# Altium PCB NB2DSK01.PcbDoc (part 13 of 17)
Units mil, origin at the board's own origin, x right, y up, seen from the top; angles counter-clockwise.
Board outline 11815 x 6500.03 mil, 8 copper layers (Top Layer, MidLayer1, MidLayer2, GND, PWR, MidLayer3, MidLayer4, Bottom Layer), stack 74.62 mil thick; 798 components, 1002 nets, 3927 pads, 3182 vias.
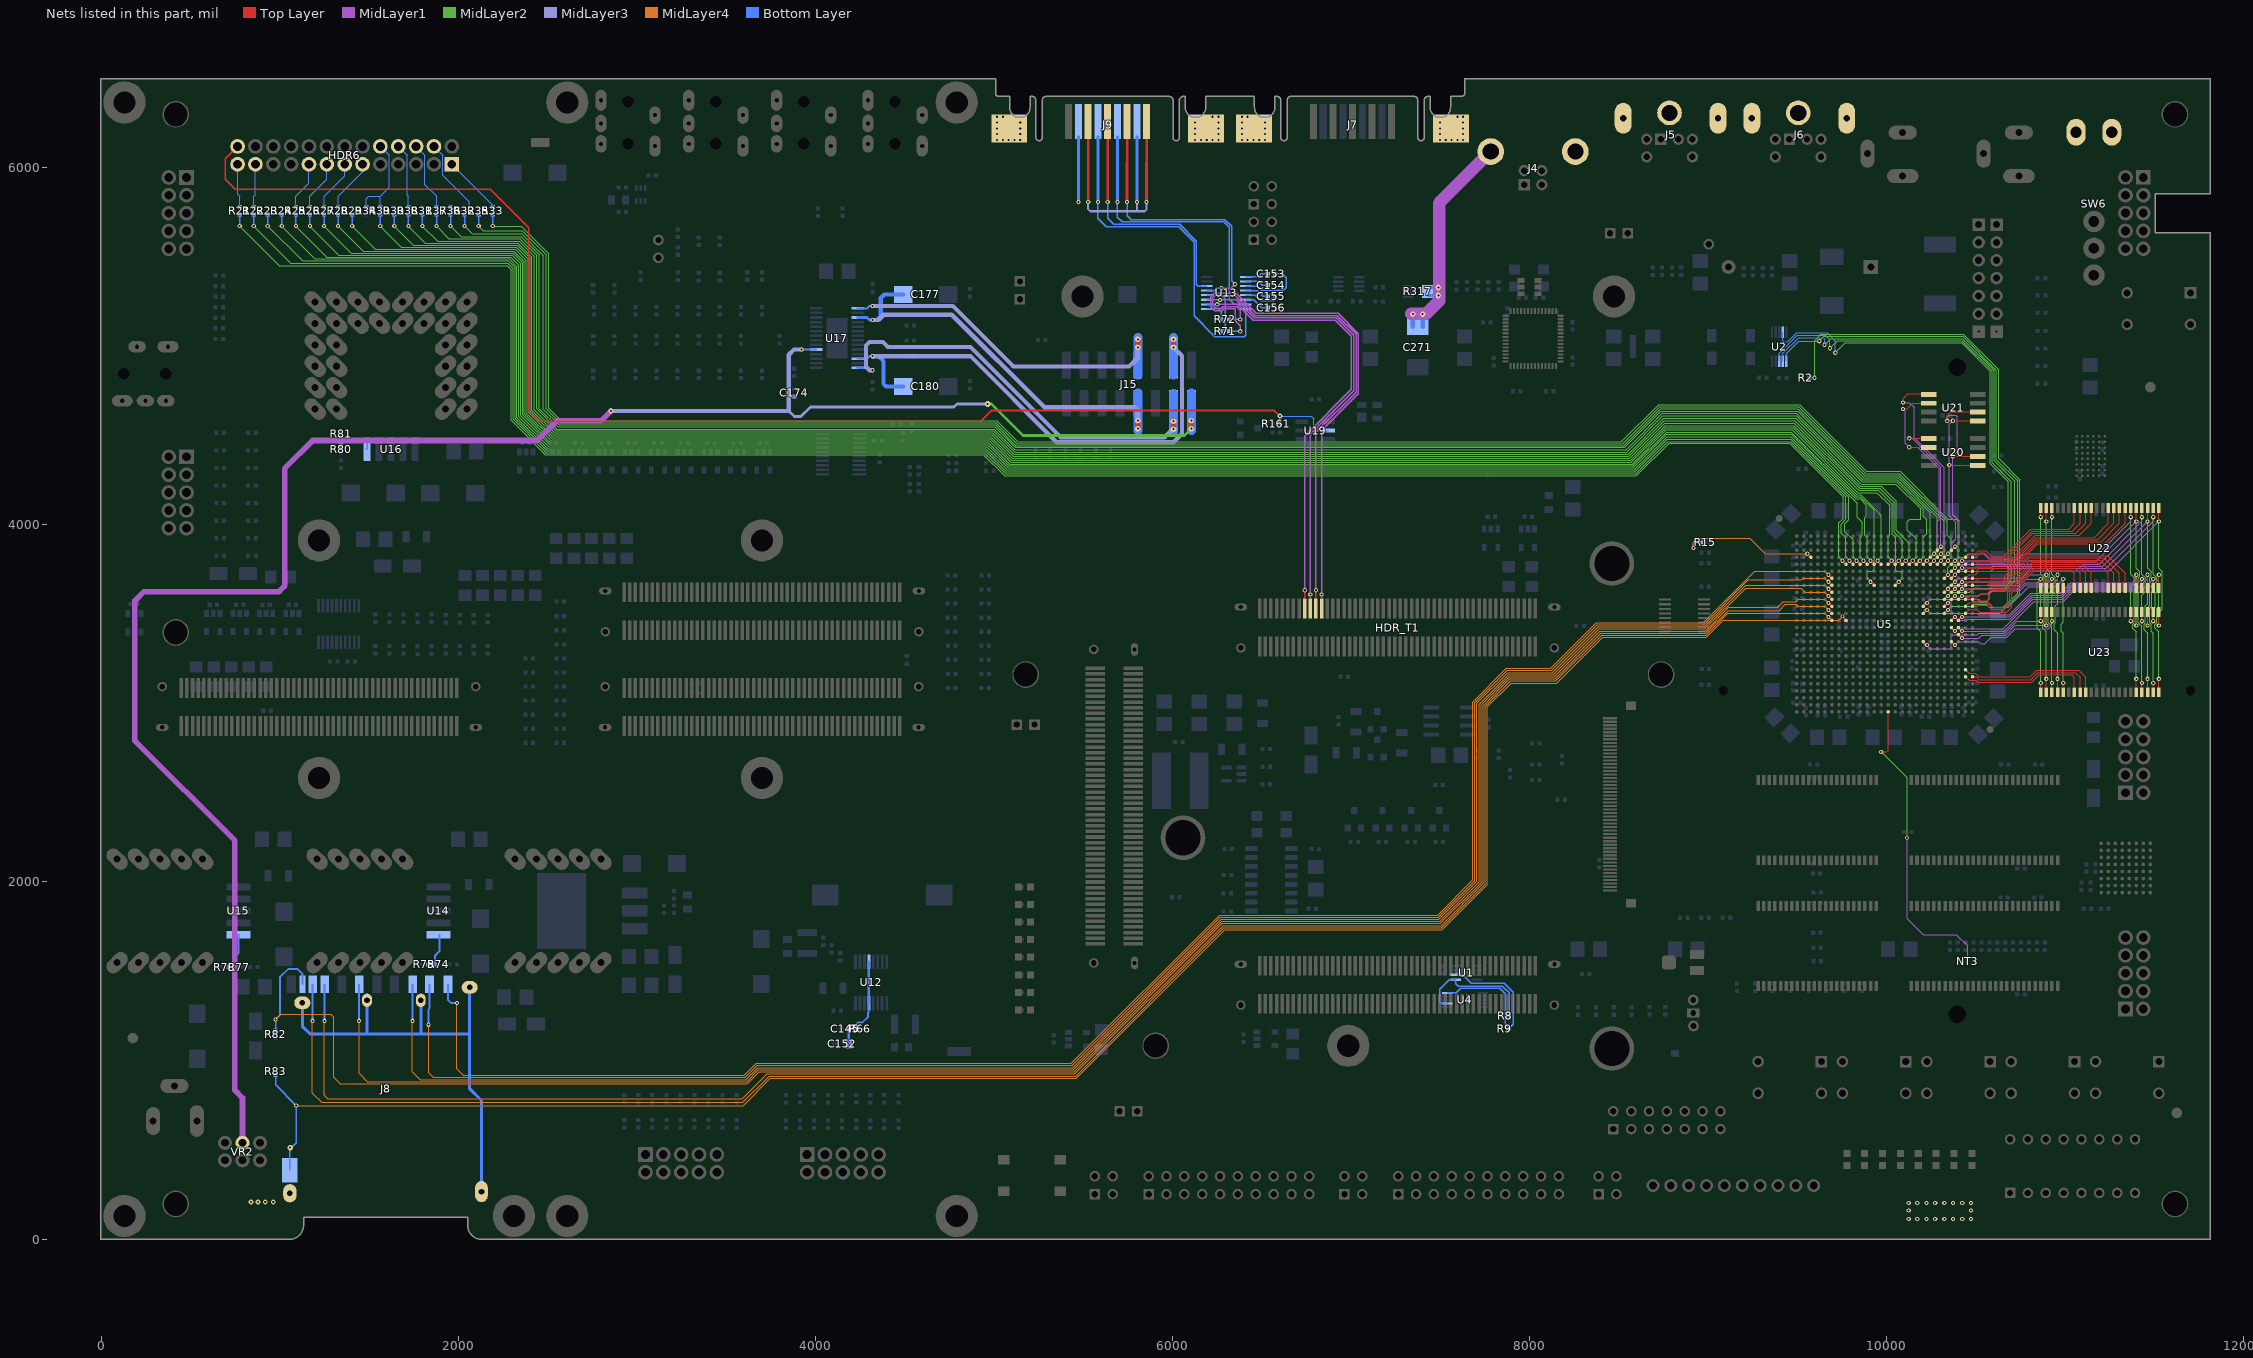
[diagram p19: the nets of this part, all layers, seen from the top]

## Via types
v1: diameter 23.62, hole 11.81, Top Layer to Bottom Layer, tented both sides, 1950 vias
v2: diameter 27.56, hole 11.81, Top Layer to Bottom Layer, tented both sides, 679 vias
v3: diameter 23.62, hole 11.81, Top Layer to Bottom Layer, 194 vias
v4: diameter 31.5, hole 11.81, Top Layer to Bottom Layer, tented both sides, 178 vias
v5: diameter 21.65, hole 11.81, Top Layer to Bottom Layer, tented both sides, 67 vias
v6: diameter 23.62, hole 11.81, Top Layer to Bottom Layer, tented bottom, 53 vias
v7: diameter 26, hole 11.81, Top Layer to Bottom Layer, tented both sides, 21 vias
v8: diameter 26, hole 11.81, Top Layer to Bottom Layer, 13 vias
v9: diameter 28, hole 11.81, Top Layer to Bottom Layer, 8 vias
v10: diameter 25.59, hole 11.81, Top Layer to Bottom Layer, tented both sides, 7 vias
v11: diameter 39.37, hole 11.81, Top Layer to Bottom Layer, tented both sides, 5 vias
v12: diameter 30, hole 11.81, Top Layer to Bottom Layer, 3 vias
v13: diameter 30, hole 11.81, Top Layer to Bottom Layer, tented both sides, 2 vias
v14: diameter 23, hole 11.81, Top Layer to Bottom Layer, tented both sides, 1 vias
v15: diameter 26.56, hole 11.81, Top Layer to Bottom Layer, tented both sides, 1 vias

## Nets (pads, with @x,y where several pads share a name; then routed paths per layer and width w, separated by ;. In a path a pad name is that pad's centre, name@x,y a point inside that pad or via, vN(x,y) a via of type N, cw(c..) or ccw(c..) an arc to the next point about the centre after c; other vN are vias at no path point) (continued)
PPRT#.D4: HDR6.6 R28.2 | length 295.4
  Bottom Layer w5: R28.2@1326.77,5781.02 1326.77,5840.55 1463.78,5977.56 HDR6.6@1463.78,6019.69
PPRT#.D5: HDR6.7 R27.2 | length 286.6
  Bottom Layer w5: R27.2@1248.03,5781.02 1248.03,5840.55 1363.78,5956.3 HDR6.7@1363.78,6019.69
PPRT#.D6: HDR6.8 R26.2 | length 277.8
  Bottom Layer w5: R26.2@1169.29,5781.02 1169.29,5840.55 1263.78,5935.04 HDR6.8@1263.78,6019.69
PPRT#.D7: HDR6.9 R25.2 | length 269
  Bottom Layer w5: R25.2@1090.55,5781.02 1090.55,5840.55 1163.78,5913.78 HDR6.9@1163.78,6019.69
PPRT#.DETECT: HDR6.18 R34.1 R39.2 | length 511.3
  Bottom Layer w5: R34.1@1484.25,5781.02 1484.25,5827.65 1497.15,5840.55 1562.99,5840.55 ; R39.2@1562.99,5781.02 1562.99,5840.55 ; HDR6.18@1563.78,6119.69 1613.94,6069.52 1613.94,5891.5 1562.99,5840.55
PPRT#.ERROR: HDR6.15 R36.1 | length 550.7
  Bottom Layer w5: HDR6.15@1863.78,6119.69 1913.9,6069.57 1913.9,5958.6 2062.1,5810.4 2062.1,5767.9 2054.9,5760.7 1977.02,5760.7 R36.1@1956.69,5781.02
PPRT#.INIT: HDR6.16 R37.2 | length 386
  Bottom Layer w5: HDR6.16@1763.78,6119.69 1812.9,6070.57 1812.9,5905.6 1877.95,5840.55 R37.2@1877.95,5781.02
PPRT#.ONE_WIRE_P: HDR6.26 R161.2 U19.2 | length 7699.6
  Top Layer w10: HDR6.26@763.78,6119.69 695,6050.91 695,5935 750,5880 2180,5880 2395,5665 2395,4635 2450,4580 4925.6,4580 4985.8,4640.2 6570.76,4640.2 v2(6601.98,4608.98)
  Bottom Layer w5: R161.2@6601.98,4567.47 v2(6601.98,4608.98) 6776.02,4608.98 6792,4593 6792,4542 6805.47,4528.53 U19.2@6874.27,4528.53
PPRT#.PE: HDR6.12 R22.1 | length 247.2
  Bottom Layer w5: R22.1@854.33,5781.02 854.33,5840.55 863.78,5850 HDR6.12@863.78,6019.69
  Bottom Layer w7.87: R22.1@854.33,5776.38 R22.1@854.33,5781.02
PPRT#.SELECT: HDR6.17 R38.2 | length 362.5
  Bottom Layer w5: HDR6.17@1663.78,6119.69 1713.94,6069.52 1713.94,5847.08 1720.47,5840.55 R38.2@1720.47,5781.02
  Bottom Layer w7.87: R38.2@1727.56,5780.71 R38.2@1727.56,5781.02
PPRT#.SELECTIN: HDR6.13 R21.1 | length 247.4
  Bottom Layer w5: HDR6.13@763.78,6019.69 763.78,5852.36 775.59,5840.55 R21.1@775.59,5781.02 R21.1@775.59,5777.17
PPRT#.STROBE: HDR6.1 R33.2 | length 333.6
  Bottom Layer w5: HDR6.1@1963.78,6019.69 2192.91,5790.55 R33.2@2192.91,5781.02
PPRT.ACK: R24.2 U5.E11 | length 10553.6
  Top Layer w7.87: v1(9870.08,3799.21) U5.E11@9889.76,3779.53
  MidLayer2 w5: v1(1011.81,5673.23) 1195.88,5489.16 2191.94,5489.16 2285.97,5489.16 2328.68,5446.45 2328.68,4600.46 2502.03,4427.11 4954.78,4427.11 5074.37,4307.52 8584.74,4307.52 8770.68,4493.45 9463.47,4493.45 9834.65,4122.28 9834.65,4043.31 9862.2,4015.75 9862.2,4000 9862.2,3940.95 9850.39,3929.13 9850.39,3818.9 v1(9870.08,3799.21)
  Bottom Layer w7.87: v1@1011.81,5677.17 R24.2@1011.81,5738.66 R24.2@1011.81,5740.55
PPRT.AUTOFD: R35.1 U5.E22 | length 9913.7
  Top Layer w7.87: U5.E22@10322.83,3779.53 v1(10342.52,3799.21)
  MidLayer2 w5: v1(2114.17,5673.23) 2139.95,5647.45 2357.68,5647.45 2492.68,5512.45 2492.68,4650.45 2570.68,4572.45 5010.22,4572.45 5128.51,4454.16 8521.39,4454.16 8728.68,4661.45 9507.49,4661.45 9881.54,4287.4 10070.87,4287.4 10338.58,4019.69 10338.58,3942.74 10362.2,3919.12 10362.2,3818.9 v1(10342.52,3799.21)
  Bottom Layer w7.87: v1@2114.17,5677.17 R35.1@2114.17,5738.66
PPRT.BUSY: R23.2 U5.E10 | length 10613.5
  Top Layer w7.87: v1(9830.71,3799.21) U5.E10@9850.39,3779.53
  MidLayer2 w5: v1(933.07,5673.23) 1128.3,5478 2279.13,5478 2317.68,5439.45 2317.68,4595.71 2497.41,4415.97 4950.17,4415.97 5069.76,4296.38 8588.61,4296.38 8771.68,4479.45 9463.33,4479.45 9787.4,4155.38 9787.4,4029.03 9764.68,4006.31 9764.68,3962.39 9811.02,3916.05 9811.02,3818.9 v1(9830.71,3799.21)
  Bottom Layer w7.87: v1@933.07,5677.17 R23.2@933.07,5738.66 R23.2@933.07,5740.95
PPRT.D0: R32.1 U5.E21 | length 9964.4
  Top Layer w7.87: U5.E21@10283.46,3779.53 v1(10303.15,3799.21)
  MidLayer2 w5: v1(2035.43,5673.23) 2079.21,5629.45 2354.68,5629.45 2476.68,5507.45 2476.68,4648.45 2564.68,4560.45 5006.48,4560.45 5122.77,4444.16 8527.39,4444.16 8733.68,4650.45 9501.78,4650.45 9876.65,4275.59 10066.93,4275.59 10322.83,4019.69 10322.83,4015.75 10322.83,4000 10322.83,3818.9 v1(10303.15,3799.21)
  Bottom Layer w7.87: v1@2035.43,5677.17 R32.1@2035.43,5738.66
PPRT.D1: R31.1 U5.E18 | length 10139.2
  Top Layer w7.87: U5.E18@10165.35,3779.53 v1(10185.04,3799.21)
  MidLayer2 w5: v1(1799.21,5673.23) 1884.11,5588.33 2341.8,5588.33 2426.68,5503.45 2426.68,4645.45 2545.31,4526.82 4996.08,4526.82 5115.67,4407.23 8543.46,4407.23 8746.68,4610.45 9491.68,4610.45 9861.97,4240.16 10055.12,4240.16 10204.72,4090.55 10204.72,4048.74 10223.68,4029.79 10223.68,3950.9 10204.72,3931.94 10204.72,3818.9 v1(10185.04,3799.21)
  Bottom Layer w7.87: v1@1799.21,5677.17 R31.1@1799.21,5738.66 R31.1@1799.21,5741.34
PPRT.D2: R30.1 U5.E16 | length 10176.1
  Top Layer w7.87: U5.E16@10086.61,3779.53 v1(10106.3,3799.21)
  MidLayer2 w5: v1(1641.73,5673.23) 1748.39,5566.57 2329.57,5566.57 2401.74,5494.39 2401.74,4637.63 2534.31,4505.06 4987.07,4505.06 5106.66,4385.47 8554.69,4385.47 8752.68,4583.45 9485.27,4583.45 9852.19,4216.54 9968.5,4216.54 10052.68,4132.36 10052.68,3969.18 10111.8,3910.06 10125.98,3895.87 10125.98,3818.9 v1(10106.3,3799.21)
  Bottom Layer w7.87: v1@1641.73,5677.17 R30.1@1641.73,5738.66
PPRT.D3: R29.1 U5.H15 | length 10497.1
  Top Layer w7.87: U5.H15@10047.24,3661.42 v1(10066.93,3681.1)
  MidLayer2 w5: v1(1405.51,5673.23) 1534.44,5544.3 2317.84,5544.3 2381.68,5480.45 2381.68,4626.19 2525.09,4482.79 4977.84,4482.79 5097.43,4363.19 8566.42,4363.19 8758.68,4555.45 9479.86,4555.45 9842.4,4192.91 9952.76,4192.91 10029.68,4115.99 10029.68,3946.91 10047.24,3929.35 10047.25,3748.68 10047.25,3747.64 10054.72,3740.16 10075.59,3740.16 10086.68,3729.07 10086.68,3700.85 v1(10066.93,3681.1)
  Bottom Layer w7.87: v1@1405.51,5677.17 R29.1@1405.51,5738.66
PPRT.D4: R28.1 U5.E14 | length 10409
  Top Layer w7.87: U5.E14@10007.87,3779.53 v1(10027.56,3799.21)
  MidLayer2 w5: v1(1326.77,5673.23) 1466.84,5533.16 2311.09,5533.16 2370.68,5473.57 2370.68,4621.44 2520.48,4471.65 4973.23,4471.65 5092.82,4352.06 8570.29,4352.06 8761.68,4543.45 9475.16,4543.45 9837.51,4181.1 9944.88,4181.1 10015.75,4110.24 10015.75,3945.9 10007.87,3938.03 10007.87,3818.9 v1(10027.56,3799.21)
  Bottom Layer w7.87: v1@1326.77,5677.17 R28.1@1326.77,5738.66 R28.1@1326.77,5741.73
PPRT.D5: R27.1 U5.E13 | length 10401
  Top Layer w7.87: v1(9948.82,3799.21) U5.E13@9968.5,3779.53
  MidLayer2 w5: v1(1248.03,5673.23) 1399.23,5522.03 2307.11,5522.03 2359.74,5469.39 2359.74,4616.64 2515.86,4460.51 4968.62,4460.51 5088.21,4340.92 8573.51,4340.92 8764.04,4531.45 9470.46,4531.45 9832.62,4169.29 9855.06,4169.29 9960.63,4063.72 9960.63,4058.85 9968.5,4050.98 9968.5,4015.75 9968.5,4000 9968.5,3818.9 v1(9948.82,3799.21)
  Bottom Layer w7.87: v1@1248.03,5677.17 R27.1@1248.03,5737.8
PPRT.D6: R26.1 U5.H12 | length 10629
  Top Layer w7.87: v1(9909.45,3681.1) U5.H12@9929.13,3661.42
  MidLayer2 w5: v1(1169.29,5673.23) 1331.63,5510.89 2301.24,5510.89 2349.74,5462.39 2349.74,4610.89 2511.25,4449.38 4964.01,4449.38 5083.6,4329.79 8577.02,4329.79 8766.68,4519.45 9465.75,4519.45 9827.73,4157.48 9852.72,4157.48 9929.13,4081.07 9929.13,3972.44 ; v1(9909.45,3681.1) 9889.76,3700.79 9889.76,3731.1 9898.82,3740.16 9920.08,3740.16 9929.13,3749.21 9929.13,3750.38 9929.13,4000
  Bottom Layer w7.87: v1@1169.29,5677.17 R26.1@1169.29,5738.66
PPRT.D7: R25.1 U5.E12 | length 10511.8
  Top Layer w7.87: v1(9909.45,3799.21) U5.E12@9929.13,3779.53
  MidLayer2 w5: v1(1090.55,5673.23) 1264.03,5499.75 2293.38,5499.75 2339.68,5453.45 2339.68,4605.2 2506.64,4438.24 4959.39,4438.24 5078.98,4318.65 8580.88,4318.65 8768.68,4506.45 9464.61,4506.45 9825.4,4145.67 9850.39,4145.67 9885.83,4110.24 9885.83,4047.24 9877.95,4039.37 9877.95,4015.75 9877.95,4000 9877.95,3940.95 9889.76,3929.13 9889.76,3818.9 v1(9909.45,3799.21)
  Bottom Layer w7.87: v1@1090.55,5677.17 R25.1@1090.55,5738.66
PPRT.ERROR: R36.2 U5.E20 | length 10019.2
  Top Layer w7.87: U5.E20@10244.09,3779.53 v1(10263.78,3799.21)
  MidLayer2 w5: v1(1956.69,5673.23) 2015.47,5614.45 2352.68,5614.45 2453.8,5513.33 2453.8,4651.33 2556.68,4548.45 5003.98,4548.45 5118.97,4433.45 8532.68,4433.45 8734.68,4635.45 9500.08,4635.45 9871.76,4263.78 10062.99,4263.78 10283.46,4043.31 10283.46,4015.75 10283.46,4000 10283.46,3818.9 v1(10263.78,3799.21)
  Bottom Layer w7.87: v1@1956.69,5677.17 R36.2@1956.69,5738.66 R36.2@1956.69,5742.13
PPRT.INIT: R37.1 U5.E19 | length 10071.4
  Top Layer w7.87: U5.E19@10204.72,3779.53 v1(10224.41,3799.21)
  MidLayer2 w5: v1(1877.95,5673.23) 1947.73,5603.45 2344.68,5603.45 2438.68,5509.45 2438.68,4649.45 2551.32,4536.82 5000.22,4536.82 5116.59,4420.45 8539.68,4420.45 8743.68,4624.45 9494.38,4624.45 9866.87,4251.97 10059.06,4251.97 10244.09,4066.93 10244.09,4015.75 10244.09,4000 10244.09,3818.9 v1(10224.41,3799.21)
  Bottom Layer w7.87: v1@1877.95,5677.17 R37.1@1877.95,5738.66 R37.1@1877.95,5740.55
PPRT.PE: R22.2 U5.E9 | length 10658.3
  Top Layer w7.87: v1(9791.34,3799.21) U5.E9@9811.02,3779.53
  MidLayer2 w5: v1(854.33,5673.23) 1062.11,5465.45 2276.68,5465.45 2306.68,5435.45 2306.68,4590.96 2492.8,4404.84 4945.56,4404.84 5065.15,4285.25 8593.47,4285.25 8774.68,4466.45 9462.19,4466.45 9771.65,4156.99 9771.65,4030.43 9745.68,4004.45 9745.68,3954.45 9771.65,3928.48 9771.65,3818.9 v1(9791.34,3799.21)
  Bottom Layer w7.87: v1@854.33,5677.17 R22.2@854.33,5730.04
PPRT.PLUG: R39.1 U5.E15 | length 10228.1
  Top Layer w7.87: U5.E15@10047.24,3779.53 v1(10066.93,3799.21)
  MidLayer2 w5: v1(1562.99,5673.23) 1680.79,5555.43 2323.7,5555.43 2391.74,5487.39 2391.74,4631.88 2529.7,4493.92 4982.46,4493.92 5102.05,4374.33 8560.56,4374.33 8755.68,4569.45 9482.56,4569.45 9847.3,4204.73 9960.63,4204.73 10041.68,4123.68 10041.68,3959.45 10086.61,3914.52 10086.61,3818.9 v1(10066.93,3799.21)
  Bottom Layer w7.87: v1@1562.99,5677.17 R39.1@1562.99,5738.66 1562.99,5741.73 R39.1@1563.78,5742.52
PPRT.SELECT: R38.1 U5.E17 | length 10273.3
  Top Layer w7.87: U5.E17@10125.98,3779.53 v1(10145.67,3799.21)
  MidLayer2 w5: v1(1720.47,5673.23) 1816,5577.7 2333.43,5577.7 2411.74,5499.39 2411.74,4643.37 2538.93,4516.19 4991.68,4516.19 5111.27,4396.6 8550.83,4396.6 8750.68,4596.45 9488.97,4596.45 9857.08,4228.35 10051.18,4228.35 10188.98,4090.55 10188.98,4030.62 10129.35,4030.62 10115.95,4017.22 10115.95,3970.67 10165.35,3921.26 10165.35,3818.9 v1(10145.67,3799.21)
  Bottom Layer w7.87: v1@1720.47,5677.17 R38.1@1720.47,5738.66 R38.1@1720.47,5746.46
PPRT.SELECTIN: R21.2 U5.E8 | length 10718.6
  Top Layer w7.87: v1(9751.97,3799.21) U5.E8@9771.65,3779.53
  MidLayer2 w5: v1(775.59,5673.23) 998.37,5450.45 2273.68,5450.45 2295.68,5428.45 2295.68,4586.21 2488.19,4393.7 4940.94,4393.7 5060.53,4274.11 8598.23,4274.11 8780.57,4456.45 9458.04,4456.45 9755.68,4158.82 9755.68,4035.45 9732.28,4012.06 9732.28,3818.9 v1(9751.97,3799.21)
  Bottom Layer w7.87: v1@775.59,5677.17 R21.2@775.59,5738.66
PPRT.STROBE: R33.1 U5.G22 | length 10007.3
  Top Layer w7.87: U5.G22@10322.83,3700.79 v1(10342.52,3720.47)
  MidLayer2 w5: v1(2192.91,5673.23) 2351.91,5673.23 2506.68,5518.45 2506.68,4654.45 2577.68,4583.45 5014.97,4583.45 5133.88,4464.54 8513.77,4464.54 8721.68,4672.45 9513.19,4672.45 9886.43,4299.21 10074.8,4299.21 10342.52,4031.5 10389.76,4031.5 10401.57,4019.69 10401.57,4003.94 10401.57,3787.4 10393.7,3779.53 10362.2,3779.53 10342.52,3759.84 v1(10342.52,3720.47)
  Bottom Layer w7.87: v1@2192.91,5677.17 R33.1@2192.91,5738.66 R33.1@2192.91,5742.52
PROG_B: R15.1 U5.D3 | length 815.2
  Top Layer w7.87: v1(9555.12,3838.58) U5.D3@9574.8,3818.9
  MidLayer4 w5: v1(8916.9,3870.9) 8916.9,3902.77 8939.32,3925.2 9232,3925.2 9318.61,3838.58 v1(9555.12,3838.58)
  Bottom Layer w5: v1(8916.9,3870.9) 8916.9,3894.7 8924.27,3902.07 R15.1@8962.1,3902.07
PWMVCCA: C145.1 C152.2 R66.1 U12.5 U12.12 | length 545.9
  Bottom Layer w10: R66.1@4229.5,1178.45 4229.5,1204.27 4238.68,1213.45 4263.68,1213.45 4293.68,1243.45 4293.68,1268.45 4299.18,1273.95 U12.5@4299.18,1321.45
  Bottom Layer w15: C152.2@4186.35,1094.18 C145.1@4186.35,1178.45 R66.1@4229.5,1178.45 ; U12.5@4299.18,1321.45 U12.12@4299.18,1553.45
REF_1V8: R74.2 R75.2 U14.5 | length 214.7
  Bottom Layer w8: R75.2@1829.86,1538.45 R74.2@1869.65,1538.45
  Bottom Layer w11.81: R74.2@1869.65,1538.45 1869.65,1587.71 1893.68,1611.75 U14.5@1893.68,1703.45
REF_2V5: R77.2 R78.1 U15.5 | length 220.5
  Bottom Layer w8: R78.1@719.86,1523.45 R77.2@752.5,1523.45
  Bottom Layer w11.81: R77.2@752.5,1523.45 752.5,1587.27 768.68,1603.45 U15.5@768.68,1704.6
REF_3V3: R80.1 R81.2 U16.5 | length 244.6
  Bottom Layer w10: R80.1@1343.68,4446.03 1343.68,4468.3 ; R80.1@1343.68,4451.03 R80.1@1344,4446.05 ; R81.2@1343.68,4488.67 1343.68,4468.3 ; R80.1@1344,4446.03 R80.1@1344.26,4441.85 ; U16.5@1483.64,4429.63 U16.5@1489.82,4423.45 1489.82,4456.38 1477.9,4468.3 1343.68,4468.3
RS232#.CTS: J9.8 U13.8 | length 1951.8
  Bottom Layer w7.87: v1(5582.15,5807.92) 5582.15,5716.95 5628.15,5670.95 6033.73,5670.95 6121.02,5583.67 6121.02,5171.18 6237.5,5054.7 6402.7,5054.7 6411.09,5063.09 U13.8@6411.09,5209.65
  Bottom Layer w15.75: v1(5582.15,5807.92) J9.8@5582.14,6173.81
RS232#.DCD: J9.1 J9.4 J9.6 | length 1735.7
  Top Layer w15.75: J9.4@5527.53,6258.86 v1(5527.62,5807.92) ; v1(5854.79,5807.92) J9.1@5855.29,6258.86
  MidLayer3 w11.81: v1(5527.62,5807.92) 5527.62,5768.38 5539.74,5756.26 5842.66,5756.26 5854.79,5768.38 v1(5854.79,5807.92) ; 5800.26,5756.26 v1(5800.26,5807.92)
  Bottom Layer w15.75: v1(5800.26,5807.92) J9.6@5800.25,6173.81
RS232#.RI: J9.9 | length 365.9
  Bottom Layer w15.75: v1(5473.09,5807.92) J9.9@5473.08,6173.81
RS232#.RTS: J9.7 U13.7 | length 1608.2
  Bottom Layer w7.87: v1(5691.2,5807.92) 5691.2,5722.9 5717.4,5696.7 6287.4,5696.7 6318.2,5665.9 6318.2,5264 6346.96,5235.24 U13.7@6411.09,5235.24
  Bottom Layer w15.75: v1(5691.2,5807.92) J9.7@5691.19,6173.81
RS232#.RXD: J9.2 U13.13 | length 1640.2
  Top Layer w15.75: v1(5745.73,5807.92) J9.2@5746.03,6258.87
  MidLayer1 w7.87: v1(6274.3,5325.1) 6327.29,5325.1 v1(6349.57,5347.38)
  Bottom Layer w7.87: v1(5745.73,5807.92) 5745.73,5732.57 5768.73,5709.57 6292.73,5709.57 6331.07,5671.23 6331.07,5365.88 v1(6349.57,5347.38) ; U13.13@6192.59,5312.01 6233.61,5312.01 6246.7,5325.1 v1(6274.3,5325.1)
RS232#.TXD: J9.3 U13.14 | length 1395.3
  Top Layer w15.75: v1(5636.68,5807.92) J9.3@5636.78,6258.87
  Bottom Layer w7.87: v1(5636.68,5807.92) 5636.68,5718.42 5671.27,5683.83 6039.07,5683.83 6133.89,5589 6133.89,5347.9 6144.19,5337.6 U13.14@6192.59,5337.6
RS232.CTS: HDR_T1.22 R72.1 | length 2852.1
  Top Layer w7.87: HDR_T1.22@6803.15,3531.5 v1(6803.15,3633.86)
  MidLayer1 w7.87: v1(6379,5150.61) 6379,5201.63 6358.26,5222.36 6280.36,5222.36 6272,5214 6241,5214 6226,5229 6226,5271 6238,5283 6352.25,5283 6463.5,5171.75 6922.37,5171.75 7027.75,5066.37 7027.75,4742.04 6803.15,4517.44 v1(6803.15,3633.86)
  Bottom Layer w7.87: R72.1@6315.54,5150.61 v1(6379,5150.61)
RS232.RTS: HDR_T1.18 U13.10 | length 2516.4
  Top Layer w7.87: HDR_T1.18@6740.16,3531.5 v1(6740.16,3633.86)
  MidLayer1 w7.87: v1(6250.66,5235.24) 6363.6,5235.24 6452.83,5146 6911.71,5146 7002,5055.71 7002,4758.96 6740.16,4497.11 v1(6740.16,3633.86)
  Bottom Layer w7.87: U13.10@6192.59,5235.24 v1(6250.66,5235.24)
RS232.RXD: HDR_T1.24 R71.1 | length 2959.3
  Top Layer w7.87: HDR_T1.24@6834.65,3531.5 v1(6834.64,3610.24)
  MidLayer1 w7.87: v1(6379,5084) 6379,5116 6351,5144 6351,5206.36 6347.87,5209.49 6285.7,5209.49 6275.21,5199 6237,5199 6213,5223 6213,5277 6232.49,5296.49 6356.96,5296.49 6468.83,5184.62 6927.7,5184.62 7040.62,5071.7 7040.62,4735.08 6834.64,4529.1 v1(6834.64,3610.24)
  Bottom Layer w7.87: R71.1@6315.54,5084 v1(6379,5084)
RS232.TXD: HDR_T1.20 U13.11 | length 2533.9
  Top Layer w7.87: HDR_T1.20@6771.65,3531.5 v1(6771.65,3610.24)
  MidLayer1 w7.87: v1(6266.22,5259.84) 6357.2,5259.84 6458.17,5158.87 6917.04,5158.87 7014.87,5061.04 7014.87,4751 6771.65,4507.78 v1(6771.65,3610.24)
  Bottom Layer w7.87: U13.11@6192.59,5260.83 v1@6265.24,5260.83
RS232_C1+: C153.1 U13.1 | length 129
  Bottom Layer w7.87: U13.1@6411.09,5388.78 6480.78,5388.78 6497.51,5405.51 C153.1@6533.14,5405.51
RS232_C1-: C153.2 U13.3 | length 364.8
  Bottom Layer w7.87: U13.3@6411.09,5337.6 6477.52,5337.6 6500.45,5314.67 6620.22,5314.67 6636.38,5330.82 6636.38,5382.83 6613.69,5405.51 C153.2@6574.48,5405.51
RS232_C2+: C155.1 U13.4 | length 135.5
  Bottom Layer w7.87: U13.4@6411.09,5312.01 6474.87,5312.01 6507.35,5279.53 C155.1@6533.14,5279.53
RS232_C2-: C155.2 U13.5 | length 203.6
  Bottom Layer w7.87: U13.5@6411.09,5286.42 6462.28,5286.42 6493.18,5255.51 6566.8,5255.51 6574.48,5263.19 C155.2@6574.48,5279.53 C155.2@6574.48,5287.4
RS232_CTS#: R72.2 U13.9 | length 139
  Bottom Layer w7.87: U13.9@6192.59,5209.65 6258.73,5209.65 6273.17,5195.2 R72.2@6273.17,5150.61 R72.2@6278.69,5145.09
RS232_RX#: R71.2 U13.12 | length 300.2
  Bottom Layer w7.87: U13.12@6192.59,5286.42 6273,5286.42 6294,5265.42 6294,5104.83 R71.2@6273.17,5084
RS232_V+: C154.2 U13.2 | length 130.6
  Bottom Layer w7.87: U13.2@6411.09,5363.19 6482.16,5363.19 6502.83,5342.52 C154.2@6533.14,5342.52
RS232_V-: C156.1 U13.6 | length 140.4
  Bottom Layer w7.87: U13.6@6411.09,5260.83 6455.39,5260.83 6499.68,5216.54 C156.1@6533.14,5216.54
RTC.CS_N: U2.4 U5.J22 | length 3003.6
  Top Layer w7.87: U5.J22@10322.83,3622.05 v1(10342.52,3641.73)
  MidLayer2 w5: v1(9712,4964) 9767.69,5019.69 10419,5019.69 10578.74,4859.95 10578.74,4342.63 10679.68,4241.69 10679.68,3687.56 10653.54,3661.42 10555.12,3661.42 10543.31,3661.42 10362.21,3661.42 v1(10342.52,3641.73)
  Bottom Layer w5: U2.4@9417.34,5078.18 9416.36,5077.19 9416.36,5030.93 9421.28,5026.01 9445.89,5026.01 9494.87,5075 9665.55,5075 9712,5028.55 v1(9712,4964)
RTC.DIN: U2.6 U5.M22 | length 3105.2
  Top Layer w7.87: U5.M22@10322.83,3503.94 v1(10342.52,3523.62)
  MidLayer2 w5: v1(9622,5029) 9648.12,5055.12 10425.99,5055.12 10614.17,4866.94 10614.17,4364.96 10732.28,4246.85 10732.28,3618.11 10653.54,3539.37 10574.8,3539.37 10559.06,3555.12 10543.31,3555.12 10484.25,3555.12 10472.44,3543.31 10362.21,3543.31 v1(10342.52,3523.62)
  Bottom Layer w5: U2.6@9437.03,4916.76 9437.03,4959.8 9506.23,5029 v1(9622,5029)
RTC.DOUT: U2.7 U5.L22 | length 3094.3
  Top Layer w7.87: U5.L22@10322.83,3543.31 v1(10342.52,3562.99)
  MidLayer2 w5: v1(9652,5009) 9686.31,5043.31 10423.66,5043.31 10602.36,4864.61 10602.36,4357.77 10715.68,4244.45 10715.68,3684.19 10661.42,3629.92 10586.61,3629.92 10574.8,3618.11 10574.8,3586.61 10559.06,3570.87 10543.31,3570.87 10484.25,3570.87 10472.44,3582.68 10362.21,3582.68 v1(10342.52,3562.99)
  Bottom Layer w5: U2.7@9417.34,4916.76 9417.34,4960.11 9505.78,5048.55 9643,5048.55 9652,5039.55 v1(9652,5009)
RTC.RST_N: R2.1 U5.M19 | length 3295.4
  Top Layer w7.87: U5.M19@10204.72,3503.94 v1(10224.41,3523.62)
  MidLayer2 w5: v1(9595.89,4823.89) 9595.89,5032 9630.82,5066.93 10428.32,5066.93 10625.98,4869.27 10625.98,4372.15 10744.09,4254.04 10744.09,3614.17 10633.86,3503.94 10562.99,3503.94 10543.31,3503.94 ; v1(10224.41,3523.62) 10244.09,3503.94 10543.31,3503.94 ; 10515.75,3503.94 10543.31,3503.94
  Bottom Layer w5: R2.1@9568,4823.89 v1(9595.89,4823.89)
RTC.SCLK: U2.8 U5.K22 | length 3063.3
  Top Layer w7.87: U5.K22@10322.83,3582.68 v1(10342.52,3602.36)
  MidLayer2 w5: v1(9682,4989) 9724.5,5031.5 10421.33,5031.5 10590.55,4862.28 10590.55,4348.58 10697.68,4241.45 10697.68,3685.87 10657.48,3645.67 10555.12,3645.67 10543.31,3645.67 10488.19,3645.67 10464.57,3622.05 10362.21,3622.05 v1(10342.52,3602.36)
  Bottom Layer w5: U2.8@9397.66,4916.76 9397.66,4962.04 9497.62,5062 9655.87,5062 9682,5035.87 v1(9682,4989)
SCL: R8.2 U1.5 U4.2 | length 702.3
  Bottom Layer w7.87: U4.2@7539.38,1319.69 7504,1319.69 7496,1327.69 7496,1399.68 7550,1453.68 U1.5@7586.54,1453.68 7586.54,1429.46 7599,1417 7847,1417 7884.97,1379.03 R8.2@7884.97,1251.8
SD.CLK: J8.5 U5.K6 | length 10521.2
  Top Layer w7.87: v1(9673.23,3602.36) U5.K6@9692.91,3582.68
  MidLayer4 w5: v1(1444.09,1222.44) 1444.09,927.79 1489.99,881.89 3614.17,881.89 3681.1,948.82 5444.88,948.82 6275.59,1779.53 7496.06,1779.53 7716.54,2000 7716.54,2996.06 7881.89,3161.42 8132.79,3161.42 8388.69,3417.32 8979.75,3417.32 9208.88,3646.45 9518.9,3646.45 9543.31,3622.05 9653.54,3622.05 v1(9673.23,3602.36)
  Bottom Layer w10: v1(1444.09,1222.44) J8.5@1444.1,1426.11
SD.CMD: J8.2 U5.J6 | length 10203.6
  Top Layer w7.87: v1(9673.23,3641.73) U5.J6@9692.91,3622.05
  MidLayer4 w5: v1(1743.11,1222.44) 1743.11,936.09 1785.5,893.7 3610.24,893.7 3677.17,960.63 5440.95,960.63 6271.65,1791.34 7492.13,1791.34 7704.72,2003.94 7704.72,3000 7877.95,3173.23 8127.89,3173.23 8383.8,3429.13 8977.42,3429.13 9209.7,3661.42 9413.39,3661.42 9433.07,3661.42 9653.54,3661.42 v1(9673.23,3641.73)
  Bottom Layer w10: v1(1743.11,1222.44) J8.2@1743.11,1426.11
SD.DAT0: J8.7 U5.M6 | length 10822.8
  Top Layer w7.87: v1(9673.23,3523.62) U5.M6@9692.91,3503.94
  MidLayer4 w5: v1(1250.2,1222.44) 1250.2,805.3 1269.05,786.45 3590.68,786.45 3729.43,925.2 5452.76,925.2 6283.46,1755.91 7503.94,1755.91 7740.16,1992.13 7740.16,2988.19 7889.76,3137.8 8142.57,3137.8 8398.48,3393.7 8984.41,3393.7 9111.16,3520.45 9397.75,3520.45 9432.42,3555.12 9492.13,3555.12 9503.94,3543.31 9653.54,3543.31 v1(9673.23,3523.62)
  Bottom Layer w10: v1(1250.2,1222.44) J8.7@1250.2,1426.11
SD.DAT1: J8.8 U5.N6 | length 10874.2
  Top Layer w7.87: v1(9673.23,3484.25) U5.N6@9692.91,3464.57
  MidLayer4 w5: v1(1183.27,1222.44) 1183.27,817.07 1234.89,765.45 3592.22,765.45 3740.16,913.39 5456.69,913.39 6287.4,1744.1 7507.87,1744.1 7751.97,1988.19 7751.97,2984.25 7893.7,3125.99 8147.46,3125.99 8403.37,3381.89 8986.74,3381.89 9108.79,3503.94 9413.39,3503.94 9433.07,3503.94 9653.54,3503.94 v1(9673.23,3484.25)
  Bottom Layer w10: v1(1183.27,1222.44) J8.8@1183.27,1426.11
SD.DAT2: J8.9 U5.G6 | length 10000.1
  Top Layer w7.87: v1(9673.23,3720.47) U5.G6@9692.91,3700.79
  MidLayer4 w5: v1(1992.27,1323.05) 1992.27,952.97 2027.92,917.32 3602.36,917.32 3669.29,984.25 5433.07,984.25 6263.78,1814.96 7484.25,1814.96 7681.1,2011.81 7681.1,3007.87 7870.08,3196.85 8118.11,3196.85 8374.02,3452.76 8972.76,3452.76 9260.16,3740.16 9413.39,3740.16 9433.07,3740.16 9653.54,3740.16 v1(9673.23,3720.47)
  Bottom Layer w10: J8.9@1941.52,1427.67 1941.52,1339.82 1958.28,1323.05 v1(1992.27,1323.05)
SD.DAT3: J8.1 U5.H6 | length 10126.4
  Top Layer w7.87: v1(9673.23,3681.1) U5.H6@9692.91,3661.42
  MidLayer4 w5: v1(1833.09,1200.91) 1833.09,932.49 1860.07,905.51 3606.3,905.51 3673.23,972.44 5437.01,972.44 6267.72,1803.15 7488.19,1803.15 7692.91,2007.87 7692.91,3003.94 7874.02,3185.04 8123,3185.04 8378.91,3440.95 8975.09,3440.95 9225.6,3691.45 9521,3691.45 9530.34,3700.79 9653.54,3700.79 v1(9673.23,3681.1)
  Bottom Layer w10: v1(1833.09,1200.91) 1833.1,1287.87 1839.35,1294.12 J8.1@1839.35,1427.67
SD.DETECT: J8.CD R82.2 U5.L6 | length 11332.2
  Top Layer w7.87: v1(9673.23,3562.99) U5.L6@9692.91,3543.31
  MidLayer4 w5: v1(976.38,1230.32) 1005.91,1259.84 1124.02,1259.84 ; 1125,1259.84 1285.43,1259.84 1303.15,1242.13 1303.15,905.22 1338.29,870.08 3618.11,870.08 3685.04,937.01 5448.82,937.01 6279.53,1767.72 7500,1767.72 7728.35,1996.06 7728.35,2992.13 7885.83,3149.61 8137.68,3149.61 8393.59,3405.51 8982.08,3405.51 9116.02,3539.45 9388.68,3539.45 9420.09,3570.87 9492.13,3570.87 9503.94,3582.68 9653.54,3582.68 v1(9673.23,3562.99)
  Bottom Layer w8: R82.2@976.38,1168.82 v1(976.38,1230.32)
  Bottom Layer w10: v1(976.38,1230.32) 1001,1254.94 1001,1465.45 1049,1513.45 1098.68,1513.45 1127.74,1484.4 J8.CD@1127.74,1427.67
SD.PROTECT: J8.WP R83.2 U5.N8 | length 11006.4
  Top Layer w7.87: v5@9751.97,3484.25 U5.N8@9771.65,3464.57
  MidLayer4 w5: v1(1092.52,748.03) 3594.49,748.03 3748.03,901.58 5460.63,901.58 6291.34,1732.28 7511.81,1732.28 7763.78,1984.25 7763.78,2980.32 7897.64,3114.17 8152.36,3114.17 8408.26,3370.08 8989.08,3370.08 9083.56,3464.57 9413.39,3464.57 9433.07,3464.57 9732.28,3464.57 v5@9751.97,3486.61
  Bottom Layer w7.87: R83.2@976.38,922.84 R83.2@976.38,919.76 976.38,864.17 v1(1092.52,748.03) 1092.52,539.52 1056.87,503.87 J8.WP@1056.87,385.15
  other v5: 9751.97,3488.19
  other v12: 1057.85,512.31
SDA: R9.2 U1.6 U4.5 | length 1126.5
  Bottom Layer w7.87: U4.5@7539.38,1378.75 7587.75,1378.75 7613.13,1404.13 7832.87,1404.13 7863,1374 7863,1197 R9.2@7883,1177 7909,1203 7909,1382 7858,1433 7673.16,1433 7629.84,1476.31 7626.89,1479.27 U1.6@7590.47,1479.27
SDRAM_FEEDBACK: NT3.1 U5.AF14 | length 1733.5
  Top Layer w5: v1(9968.5,2728.35) 10000,2728.35 10007.87,2736.22 U5.AF14@10007.87,2952.76
  MidLayer1 w5: v5(10114.17,2248.03) 10114.17,1795.28 10204.72,1704.73 10389.76,1704.73 10452.76,1641.73 NT3.1@10452.76,1562.99
  MidLayer2 w5: v1(9968.5,2728.35) 10114.17,2582.68 v5(10114.17,2248.03)
SFLASH.DIN: U5.D22 U20.5 U21.5 | length 1113.8
  Top Layer w5: v1(10350.39,4334.65) U20.5@10509.84,4334.65 ; v1(10370.08,4583.07) U21.5@10509.84,4583.07
  Top Layer w7.87: U5.D22@10322.83,3818.9 v1(10342.52,3838.58)
  MidLayer1 w5: v1(10342.52,3838.58) 10362.2,3858.27 10362.2,3893.7 10387.68,3919.17 10387.68,4013.9 10350.39,4051.18 v1(10350.39,4334.65) 10350.39,4563.39 v1(10370.08,4583.07)
SFLASH.DOUT: U5.D20 U20.2 U21.2 | length 1205.6
  Top Layer w5: v1(10090.55,4649.61) 10114.17,4649.61 10145.67,4681.1 U21.2@10234.25,4681.1 U21.2@10232.28,4683.07 ; v1(10125.98,4434.65) U20.2@10208.66,4434.65
  Top Layer w7.87: U5.D20@10244.09,3818.9 v1(10263.78,3838.58)
  MidLayer1 w5: v1(10090.55,4649.61) 10103.68,4636.48 10103.68,4456.95 v1(10125.98,4434.65) ; v1@10125.98,4433.07 v1(10125.98,4434.65) ; v1(10263.78,3838.58) 10283.46,3858.27 10283.46,4000 10283.46,4019.69 10292.73,4028.95 10292.73,4314.41 10172.49,4434.65 v1(10125.98,4434.65)
SFLASH.FLASH1_CS_N: U5.D21 U21.1 | length 1149
  Top Layer w5: v1(10090.55,4685.04) 10090.55,4704.73 10118.9,4733.07 U21.1@10208.66,4733.07
  Top Layer w7.87: U5.D21@10283.46,3818.9 v1(10303.15,3838.58)
  MidLayer1 w5: v1(10090.55,4685.04) 10125.98,4685.04 10153.54,4657.48 10153.54,4488.59 10322.83,4319.3 10322.83,4019.69 10322.83,4000 10322.83,3858.27 v1(10303.15,3838.58)
SFLASH.FLASH2_CS_N: U5.C21 U20.1 | length 799.8
  Top Layer w5: v1(10125.98,4484.65) U20.1@10208.66,4484.65
  Top Layer w7.87: U5.C21@10283.46,3858.27 v1(10303.15,3877.95)
  MidLayer1 w5: v1(10125.98,4484.65) 10141.74,4484.65 10303.15,4323.23 10303.15,4019.69 10303.15,4000 v1(10303.15,3877.95)
SFLASH.SCLK: U5.C23 U20.6 U21.6 | length 1220.5
  Top Layer w5: v1(10338.58,4582.68) 10338.58,4614.17 10357.48,4633.07 U21.6@10509.84,4633.07 ; v1(10370.08,4384.65) U20.6@10505,4384.65
  Top Layer w7.87: U5.C23@10362.2,3858.27 v1(10381.89,3877.95)
  MidLayer1 w5: v1(10338.58,4582.68) 10338.58,4606.3 10346.46,4614.17 10385.83,4614.17 10393.7,4606.3 10393.7,4408.27 v1(10370.08,4384.65) 10370.08,4056.6 10404.68,4022 10404.68,4010.98 10404.68,3992.96 10404.68,3900.75 v1(10381.89,3877.95)
SHIELD: C271.1 J4.5 J4.6 J5.MH1 J5.MH2 J5.MH3 J6.MH1 J6.MH2 J6.MH3 J7.10 J7.11 J8.S1 J8.S2 J8.S3 J8.S4 J8.S5 J8.S6 J9.10 J9.11 R317.1 SW6.S1 SW6.S2 | length 4027.9
  MidLayer1 w70: v4@7336.08,5182.23 7420.3,5182.23 7493.19,5255.12 7493.19,5801.86 J4.5@7781.89,6090.55
  Bottom Layer w17: J8.S6@1126.56,1323.34 1126.56,1192.34 1169.29,1149.61 2063.56,1149.61 ; 1488.76,1150.18 J8.S5@1488.76,1337.11 ; 1789.94,1151 J8.S4@1789.94,1337.11 ; J8.S3@2063.56,1409.95 2063.56,1149.61 ; J8.S1@2129.7,266.25 2129.7,775.81 2063.56,841.95 2063.56,1149.61 ; R317.1@7431.67,5284.64 v4(7488.65,5284.64) ; R317.1@7431.67,5329.55 v4(7488.65,5329.55)
  Bottom Layer w23.62: C271.1@7345.88,5109.24 v4(7345.88,5180.11) ; C271.1@7401,5109.24 v4(7401,5180.11)
  other v1: 10122.54,113 10171,113 10222.54,113 10271,113 10322.54,113 10371,113 10422.54,113 10471,113 10122.53,159.54 10471,159.54 10122.54,202 10171,202 10222.54,202 10271,202 10322.54,202 10371,202 10422.54,202 10471,202
  other v2: 838.68,208.45 878.68,208.45 918.68,208.45 963.68,208.45
  other v6: 5017,6156 5049.48,6156 5081.96,6156 5114.44,6156 5146.92,6156 6126.65,6156 6159.13,6156 6191.61,6156 6224.09,6156 6256.57,6156 6388.21,6156 6420.69,6156 6453.17,6156 6485.65,6156 6518.13,6156 7497.86,6156 7530.34,6156 7562.82,6156 7595.3,6156 7627.78,6156 5017,6188.48 5146.92,6188.48 6126.65,6188.48 6256.57,6188.48 6388.21,6188.48 6518.13,6188.48 7497.86,6188.48 7627.78,6188.48 5017,6220.96 5146.92,6220.96 6126.65,6220.96 6256.57,6220.96 6388.21,6220.96 6518.13,6220.96 7497.86,6220.96 7627.78,6220.96 5017,6253.44 5146.92,6253.44 6126.65,6253.44 6256.57,6253.44 6388.21,6253.44 6518.13,6253.44 7497.86,6253.44 7627.78,6253.44 5017,6285.92 5049.48,6285.92 6224.09,6285.92 6256.57,6285.92 6388.21,6285.92 6420.69,6285.92 7595.3,6285.92 7627.78,6285.92
SPK.SPK_L+: J15.8 U17.15 | length 2228.8
  Top Layer w30: v4(5805.51,4994.27) v4(5805.51,5039.19)
  MidLayer1 w30: v4(5805.51,4994.27) v4(5805.51,5039.19)
  MidLayer2 w30: v4(5805.51,4994.27) v4(5805.51,5039.19)
  MidLayer4 w30: v4(5805.51,4994.27) v4(5805.51,5039.19)
  MidLayer3 w23.62: v1(4318.9,5226.38) 4769.62,5226.38 5108.4,4887.6 5756.92,4887.6 5805.51,4936.19 v4(5805.51,4994.27)
  MidLayer3 w30: v4(5805.51,4994.27) v4(5805.51,5039.19)
  Bottom Layer w11.81: U17.15@4236.22,5212.6 4289.37,5212.6 4303.15,5226.38 v1(4318.9,5226.38)
  Bottom Layer w50: J15.8@5805.51,4838.98 v4@5805.51,5049.69
SPK.SPK_L-: C177.1 J15.7 U17.17 | length 2592.4
  Top Layer w30: v4(5805.51,4538.77) v4(5805.51,4583.68)
  MidLayer1 w30: v4(5805.51,4538.77) v4(5805.51,4583.68)
  MidLayer2 w30: v4(5805.51,4538.77) v4(5805.51,4583.68)
  MidLayer4 w30: v4(5805.51,4538.77) v4(5805.51,4583.68)
  MidLayer3 w23.62: v1(4318.9,5147.64) 4354.33,5147.64 4383.86,5177.17 4763.83,5177.17 5282.2,4658.8 5783.21,4658.8 5805.51,4636.5 v4(5805.51,4583.68)
  MidLayer3 w30: v4(5805.51,4538.77) v4(5805.51,4583.68)
  Bottom Layer w15.75: U17.17@4236.22,5161.42 4289.37,5161.42 4303.15,5147.64 v1(4318.9,5147.64)
  Bottom Layer w23.62: v1(4318.9,5147.64) 4346.46,5147.64 4366.14,5167.32 4366.14,5271.14 4385.38,5290.38 C177.1@4492.05,5290.38
  Bottom Layer w50: v4@5805.51,4528.27 J15.7@5805.51,4738.98
SPK.SPK_R+: J15.3 U17.28 | length 2655.7
  Top Layer w30: v4@6005.51,4538.77 v4@6005.51,4583.68
  MidLayer1 w30: v4@6005.51,4538.77 v4@6005.51,4583.68
  MidLayer2 w30: v4@6005.51,4538.77 v4@6005.51,4583.68
  MidLayer4 w30: v4@6005.51,4538.77 v4@6005.51,4583.68
  MidLayer3 w23.62: v1(4318.9,4866.14) 4303.15,4866.14 4283.46,4885.83 4283.46,5003.94 4303.15,5023.62 4377.95,5023.62 4405.51,4996.06 4868.31,4996.06 5373,4491.38 5956.61,4491.38 6004,4538.77 v4@6005.51,4538.77
  MidLayer3 w30: v4@6005.51,4538.77 v4@6005.51,4583.68
  Bottom Layer w11.81: U17.28@4236.22,4879.92 4289.37,4879.92 4303.15,4866.14 v1(4318.9,4866.14)
  Bottom Layer w50: v4@6005.48,4525.89 J15.3@6005.48,4736.6
  other v4: 6005.48,4536.39 6005.48,4581.3
SPK.SPK_R-: C180.1 J15.4 U17.26 | length 3297.7
  Top Layer w30: v4(6005.45,4994.27) v4(6005.45,5039.19)
  MidLayer1 w30: v4(6005.45,4994.27) v4(6005.45,5039.19)
  MidLayer2 w30: v4(6005.45,4994.27) v4(6005.45,5039.19)
  MidLayer4 w30: v4(6005.45,4994.27) v4(6005.45,5039.19)
  MidLayer3 w23.62: v1(4318.9,4944.88) 4868.12,4944.88 5350.24,4462.76 6004.69,4462.76 6052.47,4510.53 6052.47,4947.25 v4(6005.45,4994.27)
  MidLayer3 w30: v4(6005.45,4994.27) v4(6005.45,5039.19)
  Bottom Layer w11.81: U17.26@4236.22,4931.1 4289.37,4931.1 4303.15,4944.88 v1(4318.9,4944.88)
  Bottom Layer w23.62: v1(4318.9,4944.88) 4354.12,4944.88 4382,4917 4382,4790 4396.68,4775.32 C180.1@4492.05,4775.32
  Bottom Layer w50: J15.4@6005.51,4838.98 v4@6005.51,5049.69
SPK.VOL: C174.2 J15.1 U17.5 VR2.2 | length 11105.2
  Top Layer w30: v4(6105.51,4538.77) v4(6105.51,4583.68)
  MidLayer1 w30: v4(6105.51,4538.77) v4(6105.51,4583.68)
  MidLayer1 w31.5: VR2.2@791.34,539.37 791.34,790.8 748.68,833.45 748.68,2231.63 192.91,2787.4 189,2791.31 189,3574.83 240.67,3626.5 996.06,3626.5 1027.56,3657.99 1027.56,4314.96 1185.04,4472.44 2440.95,4472.44 2551.18,4582.68 2799.21,4582.68 v2(2854.33,4637.8)
  MidLayer2 w15.75: v4(4964.57,4677.17) 4986.83,4677.17 5163.1,4500.9 6067.65,4500.9 v4(6105.51,4538.77)
  MidLayer2 w30: v4(6105.51,4538.77) v4(6105.51,4583.68)
  MidLayer4 w30: v4(6105.51,4538.77) v4(6105.51,4583.68)
  MidLayer3 w15.75: 3850.39,4637.8 3881.89,4606.3 3918,4606.3 3971.7,4660 4775,4660 4792.17,4677.17 v4(4964.57,4677.17)
  MidLayer3 w23.62: v2(2854.33,4637.8) 3850.39,4637.8 3850.39,4952.76 3879.92,4982.28 v1(3921.26,4982.28)
  MidLayer3 w30: v4(6105.51,4538.77) v4(6105.51,4583.68)
  Bottom Layer w11.81: v1(3921.26,4982.28) U17.5@4003.94,4982.28
  Bottom Layer w15.75: v1(3850.39,4720.47) C174.2@3881.89,4720.47
  Bottom Layer w50: v4@6105.51,4528.27 J15.1@6105.51,4738.98
SRAM.A0: U5.J23 U22.1 U23.1 | length 1232.3
  Top Layer w5: U23.1@10862.2,3062.99 v1(10862.21,3114.17) ; U22.1@10862.2,3645.67 v1(10862.21,3696.85)
  Top Layer w7.87: U5.J23@10362.2,3622.05 v1(10381.89,3641.73)
  MidLayer1 w5: v1(10381.89,3641.73) 10401.58,3661.42 10543.31,3661.42 10562.99,3661.42 10744.09,3661.42 10779.53,3696.85 v1(10862.21,3696.85)
  MidLayer2 w5: v1(10862.21,3114.17) 10862.21,3401.58 10842.52,3421.26 10842.52,3677.17 v1(10862.21,3696.85)
SRAM.A1: U5.H24 U22.2 U23.2 | length 1265.2
  Top Layer w5: U23.2@10893.7,3062.99 v1(10893.7,3137.8) ; U22.2@10893.7,3645.67 v1(10893.7,3720.47)
  Top Layer w7.87: U5.H24@10401.58,3661.42 v1(10421.26,3681.1)
  MidLayer1 w5: v1(10421.26,3681.1) 10543.31,3681.1 10562.99,3681.1 10748.03,3681.1 10787.4,3720.47 v1(10893.7,3720.47)
  MidLayer2 w5: v1(10893.7,3137.8) 10893.7,3401.58 10874.02,3421.26 10874.02,3444.88 10881.89,3452.76 10881.89,3641.73 10893.7,3653.54 v1(10893.7,3720.47)
SRAM.A2: U5.J24 U22.3 U23.3 | length 1256
  Top Layer w5: U23.3@10925.2,3062.99 v1(10925.2,3114.17) ; U22.3@10925.2,3645.67 v1(10925.2,3696.85)
  Top Layer w7.87: U5.J24@10401.58,3622.05 v1(10421.26,3641.73)
  MidLayer1 w5: v1(10421.26,3641.73) 10543.31,3641.73 10562.99,3641.73 10740.16,3641.73 10775.59,3677.17 10905.51,3677.17 v1(10925.2,3696.85)
  MidLayer2 w5: v1(10925.2,3114.17) 10925.2,3433.07 10905.51,3452.76 10905.51,3618.11 10925.2,3637.8 v1(10925.2,3696.85)
SRAM.A3: U5.K24 U22.4 U23.4 | length 1374.6
  Top Layer w5: U23.4@10956.69,3062.99 v1(10956.7,3137.8) ; U22.4@10956.69,3645.67 v1(10956.69,3720.47)
  Top Layer w7.87: U5.K24@10401.58,3582.68 v1(10421.26,3602.36)
  MidLayer1 w5: v1(10421.26,3602.36) 10515.75,3602.36 10527.56,3614.17 10543.31,3614.17 10562.99,3614.17 10570.87,3614.17 10586.61,3629.92 10744.09,3629.92 10779.53,3665.36 10925.2,3665.36 10956.69,3696.85 v1(10956.69,3720.47)
  MidLayer2 w5: v1(10956.7,3137.8) 10956.7,3393.7 10937.01,3413.39 10937.01,3444.88 10944.88,3452.76 10944.88,3547.24 10956.69,3559.06 v1(10956.69,3720.47)
SRAM.A4: U5.K23 U22.5 U23.5 | length 1420.3
  Top Layer w5: U23.5@10988.19,3062.99 v1(10988.19,3114.17) ; U22.5@10988.19,3645.67 v1(10988.19,3696.85)
  Top Layer w7.87: U5.K23@10362.2,3582.68 v1(10381.89,3602.36)
  MidLayer1 w5: v1(10381.89,3602.36) 10401.58,3582.68 10515.75,3582.68 10527.56,3570.87 10543.31,3570.87 10562.99,3570.87 10594.49,3539.37 10681.1,3539.37 10795.28,3653.54 10944.88,3653.54 v1(10988.19,3696.85)
  MidLayer2 w5: v1(10988.19,3114.17) 10988.19,3393.7 10976.38,3405.51 10976.38,3444.88 10988.19,3456.69 v1(10988.19,3696.85)
SRAM.A5: U5.L19 U22.18 U23.18 | length 2135.1
  Top Layer w5: U23.18@11397.64,3062.99 v1(11397.64,3137.8) ; U22.18@11397.64,3645.67 v1(11397.64,3720.47)
  Top Layer w7.87: U5.L19@10204.72,3543.31 v1(10224.41,3562.99)
  MidLayer1 w5: v1(10224.41,3562.99) 10244.1,3582.68 10354.33,3582.68 10362.2,3574.8 10362.2,3515.75 10374.02,3503.94 10507.87,3503.94 10515.75,3496.06 10543.31,3496.06 10562.99,3496.06 10685.04,3496.06 10807.09,3618.11 10972.44,3618.11 11031.5,3677.17 11377.95,3677.17 11397.64,3696.85 v1(11397.64,3720.47)
  MidLayer2 w5: v1(11397.64,3137.8) 11397.64,3401.58 11377.95,3421.26 11377.95,3444.88 11385.83,3452.76 11385.83,3641.73 11397.64,3653.54 v1(11397.64,3720.47)
SRAM.A6: U5.N24 U22.19 U23.19 | length 1825.1
  Top Layer w5: U23.19@11429.13,3062.99 v1(11429.13,3114.17) ; U22.19@11429.13,3645.67 v1(11429.13,3696.85)
  Top Layer w7.87: U5.N24@10401.58,3464.57 v1(10421.26,3484.25)
  MidLayer1 w5: v1(10421.26,3484.25) 10543.31,3484.25 10562.99,3484.25 10688.98,3484.25 10811.02,3606.3 10976.38,3606.3 11035.43,3665.36 11397.64,3665.36 v1(11429.13,3696.85)
  MidLayer2 w5: v1(11429.13,3114.17) 11429.13,3433.07 11409.45,3452.76 11409.45,3618.11 11429.13,3637.8 v1(11429.13,3696.85)
SRAM.A7: U5.N23 U22.20 U23.20 | length 1980.9
  Top Layer w5: U23.20@11460.63,3062.99 v1(11460.63,3137.8) ; U22.20@11460.63,3645.67 v1(11460.63,3720.47)
  Top Layer w7.87: U5.N23@10362.2,3464.57 v1(10381.89,3484.25)
  MidLayer1 w5: v1(10381.89,3484.25) 10401.58,3464.57 10433.07,3464.57 10440.95,3472.44 10543.31,3472.44 10562.99,3472.44 10692.91,3472.44 10814.96,3594.49 10980.32,3594.49 11039.37,3653.54 11413.39,3653.54 11460.63,3700.79 v1(11460.63,3720.47)
  MidLayer2 w5: v1(11460.63,3137.8) 11460.63,3393.7 11440.95,3413.39 11440.95,3444.88 11448.82,3452.76 11448.82,3547.24 11460.63,3559.06 v1(11460.63,3720.47)
SRAM.A8: U5.P23 U22.21 U23.21 | length 1966.6
  Top Layer w5: U23.21@11492.13,3062.99 v1(11492.13,3114.17) ; U22.21@11492.13,3645.67 v1(11492.13,3696.85)
  Top Layer w7.87: U5.P23@10362.2,3425.2 v1(10381.89,3405.51)
  MidLayer1 w5: v1(10381.89,3405.51) 10401.58,3425.2 10433.07,3425.2 10440.95,3417.32 10543.31,3417.32 10562.99,3417.32 10653.54,3417.32 10818.9,3582.68 10984.25,3582.68 11043.31,3641.73 11437.01,3641.73 v1(11492.13,3696.85)
  MidLayer2 w5: v1(11492.13,3114.17) 11492.13,3393.7 11480.32,3405.51 11480.32,3444.88 11472.44,3452.76 11472.44,3531.5 11484.25,3543.31 11484.25,3622.05 11492.13,3629.92 v1(11492.13,3696.85)
SRAM.A9: U5.P24 U22.22 U23.22 | length 2026.4
  Top Layer w5: U23.22@11523.62,3062.99 v1(11523.62,3137.8) ; U22.22@11523.62,3645.67 v1(11523.62,3720.47)
  Top Layer w7.87: U5.P24@10401.58,3425.2 v1(10421.26,3405.51)
  MidLayer1 w5: v1(10421.26,3405.51) 10543.31,3405.51 10562.99,3405.51 10657.48,3405.51 10822.83,3570.87 10988.19,3570.87 11047.24,3629.92 11456.69,3629.92 11523.62,3696.85 v1(11523.62,3720.47)
  MidLayer2 w5: v1(11523.62,3137.8) 11523.62,3401.58 11500,3425.2 11500,3440.95 11511.81,3452.76 11511.81,3531.5 11523.62,3543.31 v1(11523.62,3720.47)
SRAM.A10: U5.H23 U22.23 U23.23 | length 2058.4
  Top Layer w5: v1(11523.62,3437.01) U23.23@11523.62,3511.81 ; v1(11523.62,4019.69) U22.23@11523.62,4094.49
  Top Layer w7.87: U5.H23@10362.2,3661.42 v1(10381.89,3681.1)
  MidLayer1 w5: v1(10381.89,3681.1) 10401.58,3700.79 10543.31,3700.79 10562.99,3700.79 10751.97,3700.79 10795.28,3744.1 11248.03,3744.1 v1(11523.62,4019.69)
  MidLayer2 w5: v1(11523.62,3437.01) 11523.62,3507.87 11543.31,3527.56 11543.31,3736.22 11523.62,3755.91 v1(11523.62,4019.69)
SRAM.A11: U5.G23 U22.24 U23.24 | length 1987
  Top Layer w5: v1(11492.13,3460.63) U23.24@11492.13,3511.81 ; v1(11492.13,4043.31) U22.24@11492.13,4094.49
  Top Layer w7.87: U5.G23@10362.2,3700.79 v1(10381.89,3720.47)
  MidLayer1 w5: v1(10381.89,3720.47) 10401.58,3740.16 10543.31,3740.16 10562.99,3740.16 10582.68,3740.16 10598.43,3755.91 11228.35,3755.91 11492.13,4019.69 v1(11492.13,4043.31)
  MidLayer2 w5: v1(11492.13,3460.63) 11492.13,3527.56 11503.94,3539.37 11503.94,3618.11 11511.81,3625.99 11511.81,3704.73 11492.13,3724.41 v1(11492.13,4043.31)
SRAM.A12: U5.F24 U22.25 U23.25 | length 1923.4
  Top Layer w5: v1(11460.63,3437.01) U23.25@11460.63,3511.81 ; v1(11460.63,4019.69) U22.25@11460.63,4094.49
  Top Layer w7.87: U5.F24@10401.58,3740.16 v1(10421.26,3759.84)
  MidLayer1 w5: v1(10421.26,3759.84) 10543.31,3759.84 10562.99,3759.84 10586.61,3759.84 10594.49,3767.72 11208.66,3767.72 11320.43,3879.49 v1(11460.63,4019.69)
  MidLayer2 w5: v1(11460.63,3437.01) 11460.63,3539.37 11472.44,3551.18 11472.44,3704.73 11480.32,3712.6 11480.32,3736.22 11460.63,3755.91 v1(11460.63,4019.69)
SRAM.A13: U5.F23 U22.26 U23.26 | length 1907.7
  Top Layer w5: v1(11429.13,3460.63) U23.26@11429.13,3511.81 ; v1(11429.13,4043.31) U22.26@11429.13,4094.49
  Top Layer w7.87: U5.F23@10362.2,3740.16 v1(10381.89,3759.84)
  MidLayer1 w5: v1(10381.89,3759.84) 10401.58,3779.53 10543.31,3779.53 10562.99,3779.53 11188.98,3779.53 11429.13,4019.69 v1(11429.13,4043.31)
  MidLayer2 w5: v1(11429.13,3460.63) 11429.13,3606.3 11448.82,3625.99 11448.82,3704.73 11429.13,3724.41 v1(11429.13,4043.31)
SRAM.A14: U5.E24 U22.27 U23.27 | length 1844.1
  Top Layer w5: v1(11397.64,3437.01) U23.27@11397.64,3511.81 ; v1(11397.64,4019.69) U22.27@11397.64,4094.49
  Top Layer w7.87: U5.E24@10401.58,3779.53 v1(10421.26,3799.21)
  MidLayer1 w5: v1(10421.26,3799.21) 10543.31,3799.21 10562.99,3799.21 11177.17,3799.21 v1(11397.64,4019.69)
  MidLayer2 w5: v1(11397.64,3437.01) 11397.64,3629.92 11409.45,3641.73 11409.45,3704.73 11417.32,3712.6 11417.32,3736.22 11397.64,3755.91 v1(11397.64,4019.69)
SRAM.A15: U5.T23 U22.42 U23.42 | length 1351.6
  Top Layer w5: v1(10925.2,3460.63) U23.42@10925.2,3511.81 ; v1(10925.2,4043.31) U22.42@10925.2,4094.49
  Top Layer w7.87: U5.T23@10362.2,3346.46 v1(10381.89,3326.77)
  MidLayer1 w5: v1(10381.89,3326.77) 10401.58,3346.46 10515.75,3346.46 10527.56,3334.65 10549.97,3334.65 10584.78,3369.45 10672.6,3369.45 10720.47,3417.32 10905.51,3417.32 10925.2,3437.01 v1(10925.2,3460.63)
  MidLayer2 w5: v1(10925.2,3460.63) 10925.2,3606.3 10944.88,3625.99 10944.88,3704.73 10925.2,3724.41 v1(10925.2,4043.31)
SRAM.A16: U5.R24 U22.43 U23.43 | length 1278.2
  Top Layer w5: v1(10893.7,3437.01) U23.43@10893.7,3511.81 ; v1(10893.7,4019.69) U22.43@10893.7,4094.49
  Top Layer w7.87: U5.R24@10401.58,3385.83 v1(10421.26,3366.14)
  MidLayer1 w5: v1(10421.26,3366.14) 10515.75,3366.14 10531.5,3381.89 10543.31,3381.89 10562.99,3381.89 10665.35,3381.89 10720.47,3437.01 v1(10893.7,3437.01)
  MidLayer2 w5: v1(10893.7,3437.01) 10893.7,3629.92 10905.51,3641.73 10905.51,3704.73 10913.39,3712.6 10913.39,3736.22 10893.7,3755.91 v1(10893.7,4019.69)
SRAM.A17: U5.T19 U22.44 U23.44 | length 1473.3
  Top Layer w5: v1(10862.21,3460.63) U23.44@10862.21,3511.81 ; v1(10862.21,4043.31) U22.44@10862.21,4094.49
  Top Layer w7.87: U5.T19@10204.72,3346.46 v1(10224.41,3326.77)
  MidLayer1 w5: v1(10224.41,3326.77) 10244.1,3307.09 10354.33,3307.09 10362.2,3314.96 10362.2,3374.02 10374.02,3385.83 10507.87,3385.83 10515.75,3393.7 10543.31,3393.7 10562.99,3393.7 10661.42,3393.7 10728.35,3460.63 v1(10862.21,3460.63)
  MidLayer2 w5: v1(10862.21,3460.63) 10862.21,3649.61 10881.89,3669.29 10881.89,3704.73 10862.21,3724.41 v1(10862.21,4043.31)
SRAM.A18: U5.E23 U22.28 U23.28 | length 1850.9
  Top Layer w5: v1(11366.14,3460.63) U23.28@11366.14,3511.81 ; v1(11366.14,4043.31) U22.28@11366.14,4094.49
  Top Layer w7.87: U5.E23@10362.2,3779.53 v1(10381.89,3799.21)
  MidLayer1 w5: v1(10381.89,3799.21) 10401.58,3818.9 10437.01,3818.9 10456.69,3838.58 10543.47,3838.58 10570.6,3811.45 10738.53,3811.45 10765.66,3838.58 11185.04,3838.58 11366.14,4019.69 v1(11366.14,4043.31)
  MidLayer2 w5: v1(11366.14,3460.63) 11366.14,3649.61 11385.83,3669.29 11385.83,3704.73 11366.14,3724.41 v1(11366.14,4043.31)
SRAM.D0: U5.M25 U22.7 | length 854.8
  Top Layer w5: U5.M25@10440.95,3503.94 10460.63,3523.62 10507.87,3523.62 10519.69,3511.81 10543.31,3511.81 10562.99,3511.81 10673.23,3511.81 10700.79,3539.37 10700.79,3618.11 10826.77,3744.1 11035.43,3744.1 11051.18,3728.35 U22.7@11051.18,3645.67
SRAM.D1: U5.L26 U22.8 | length 841
  Top Layer w5: U5.L26@10480.32,3543.31 10507.87,3543.31 10515.75,3551.18 10543.31,3551.18 10562.99,3551.18 10586.61,3527.56 10657.48,3527.56 10688.98,3559.06 10688.98,3622.05 10822.83,3755.91 11055.12,3755.91 11082.68,3728.35 U22.8@11082.68,3645.67
SRAM.D2: U5.L25 U22.9 | length 921.6
  Top Layer w5: U5.L25@10440.95,3543.31 10460.63,3562.99 10543.31,3562.99 10562.99,3562.99 10570.87,3562.99 10594.49,3539.37 10653.54,3539.37 10677.17,3562.99 10677.17,3625.98 10818.9,3767.72 11074.8,3767.72 11114.17,3728.35 U22.9@11114.17,3645.67
SRAM.D3: U5.K26 U22.10 | length 871.1
  Top Layer w5: U5.K26@10480.32,3582.68 10507.87,3582.68 10515.75,3574.8 10543.31,3574.8 10562.99,3574.8 10574.8,3586.61 10574.8,3610.24 10598.43,3633.86 10669.29,3633.86 10814.96,3779.53 11094.49,3779.53 11145.67,3728.35 U22.10@11145.67,3645.67
SRAM.D4: U5.K25 U22.13 | length 994.4
  Top Layer w5: U5.K25@10440.95,3582.68 10460.63,3602.36 10515.75,3602.36 10527.56,3614.17 10543.31,3614.17 10562.99,3614.17 10598.11,3649.29 10668.98,3649.29 10811.02,3791.34 11177.17,3791.34 11240.16,3728.35 U22.13@11240.16,3645.67
SRAM.D5: U5.J25 U22.14 | length 1019.4
  Top Layer w5: U5.J25@10440.95,3622.05 10460.63,3641.73 10543.31,3641.73 10562.99,3641.73 10570.87,3641.73 10588.43,3659.29 10659.29,3659.29 10803.15,3803.15 11196.85,3803.15 11271.65,3728.35 U22.14@11271.65,3645.67
SRAM.D6: U5.H26 U22.15 | length 1005
  Top Layer w5: U5.H26@10480.32,3661.42 10543.31,3661.42 10562.99,3661.42 10570.87,3669.29 10653.54,3669.29 10669.29,3685.04 10799.21,3814.96 11216.54,3814.96 11303.15,3728.35 U22.15@11303.15,3645.67
SRAM.D7: U5.H25 U22.16 | length 1085.6
  Top Layer w5: U5.H25@10440.95,3661.42 10460.63,3681.1 10543.31,3681.1 10562.99,3681.1 10649.61,3681.1 10795.28,3826.77 11236.22,3826.77 11334.65,3728.35 U22.16@11334.65,3645.67
SRAM.D8: U5.G26 U22.29 | length 1068.1
  Top Layer w5: U5.G26@10480.32,3700.79 10543.31,3700.79 10562.99,3700.79 10653.54,3700.79 10846.46,3893.7 11220.47,3893.7 11334.65,4007.87 U22.29@11334.65,4094.49
SRAM.D9: U5.G25 U22.30 | length 1076
  Top Layer w5: U5.G25@10440.95,3700.79 10460.63,3720.47 10496.06,3720.47 10515.75,3740.16 10543.31,3740.16 10562.99,3740.16 10676.39,3740.16 10841.74,3905.51 11200.79,3905.51 11303.15,4007.87 U22.30@11303.15,4094.49
SRAM.D10: U5.F26 U22.31 | length 988.8
  Top Layer w5: U5.F26@10480.32,3740.16 10500,3740.16 10515.75,3755.91 10543.31,3755.91 10562.99,3755.91 10676.13,3755.91 10837.55,3917.32 11181.1,3917.32 11271.65,4007.87 U22.31@11271.65,4094.49
SRAM.D11: U5.F25 U22.32 | length 996.7
  Top Layer w5: U5.F25@10440.95,3740.16 10460.63,3759.84 10500,3759.84 10511.81,3771.65 10543.31,3771.65 10562.99,3771.65 10675.95,3771.65 10833.43,3929.13 11161.42,3929.13 11240.16,4007.87 U22.32@11240.16,4094.49
SRAM.D12: U5.E26 U22.35 | length 846.6
  Top Layer w5: U5.E26@10480.32,3779.53 10500,3779.53 10507.87,3787.4 10543.31,3787.4 10562.99,3787.4 10677.12,3787.4 10830.67,3940.95 11078.74,3940.95 11145.67,4007.87 U22.35@11145.67,4094.49
SRAM.D13: U5.E25 U22.36 | length 854.4
  Top Layer w5: U5.E25@10440.95,3779.53 10460.63,3799.21 10543.31,3799.21 10562.99,3799.21 10664.44,3799.21 10817.98,3952.76 11059.05,3952.76 11114.17,4007.88 U22.36@11114.17,4094.49
SRAM.D14: U5.D26 U22.37 | length 795.3
  Top Layer w5: U5.D26@10480.32,3818.9 10500,3818.9 10524.39,3843.29 10546.38,3843.29 10580.21,3809.45 10658.68,3809.45 10813.8,3964.57 11039.37,3964.57 11082.68,4007.87 U22.37@11082.68,4094.49
SRAM.D15: U5.D25 U22.38 | length 838.3
  Top Layer w5: U5.D25@10440.95,3818.9 10460.63,3838.58 10500,3838.58 10516.33,3854.91 10553.22,3854.91 10586.68,3821.45 10652.72,3821.45 10673.07,3841.8 10807.65,3976.38 11019.68,3976.38 11051.18,4007.87 ; 11051.18,4043.31 11051.18,4007.87 ; U22.38@11051.18,4094.49 11051.18,4007.88
SRAM.D16: U5.AA25 U23.7 | length 730.4
  Top Layer w5: U5.AA25@10440.95,3149.61 10460.63,3129.92 10500,3129.92 10511.81,3118.11 10543.31,3118.11 10562.99,3118.11 10811.02,3118.11 10854.33,3161.42 11035.43,3161.42 11051.18,3145.67 U23.7@11051.18,3062.99
SRAM.D17: U5.AA26 U23.8 | length 719.3
  Top Layer w5: U5.AA26@10480.32,3149.61 10500,3149.61 10515.75,3133.86 10543.31,3133.86 10562.99,3133.86 10807.09,3133.86 10846.46,3173.23 11055.12,3173.23 11082.68,3145.67 U23.8@11082.68,3062.99
SRAM.D18: U5.Y25 U23.9 | length 803.2
  Top Layer w5: U5.Y25@10440.95,3188.98 10460.63,3169.29 10496.06,3169.29 10515.75,3149.61 10543.31,3149.61 10562.99,3149.61 10803.15,3149.61 10838.58,3185.04 11074.8,3185.04 11114.17,3145.67 U23.9@11114.17,3062.99